# Altium PCB 0.PCB1.PcbDoc (part 11 of 12)
Units mm, origin at the board's own origin, x right, y up, seen from the top; angles counter-clockwise.
Board outline 77 x 72 mm, 6 copper layers (Top Layer, Layer 1, Layer 3, Layer 4, Layer 2, Bottom Layer), stack 1.538 mm thick; 570 components, 490 nets, 3331 pads, 1909 vias.
Unrouted connection lines stored in the file: 2.
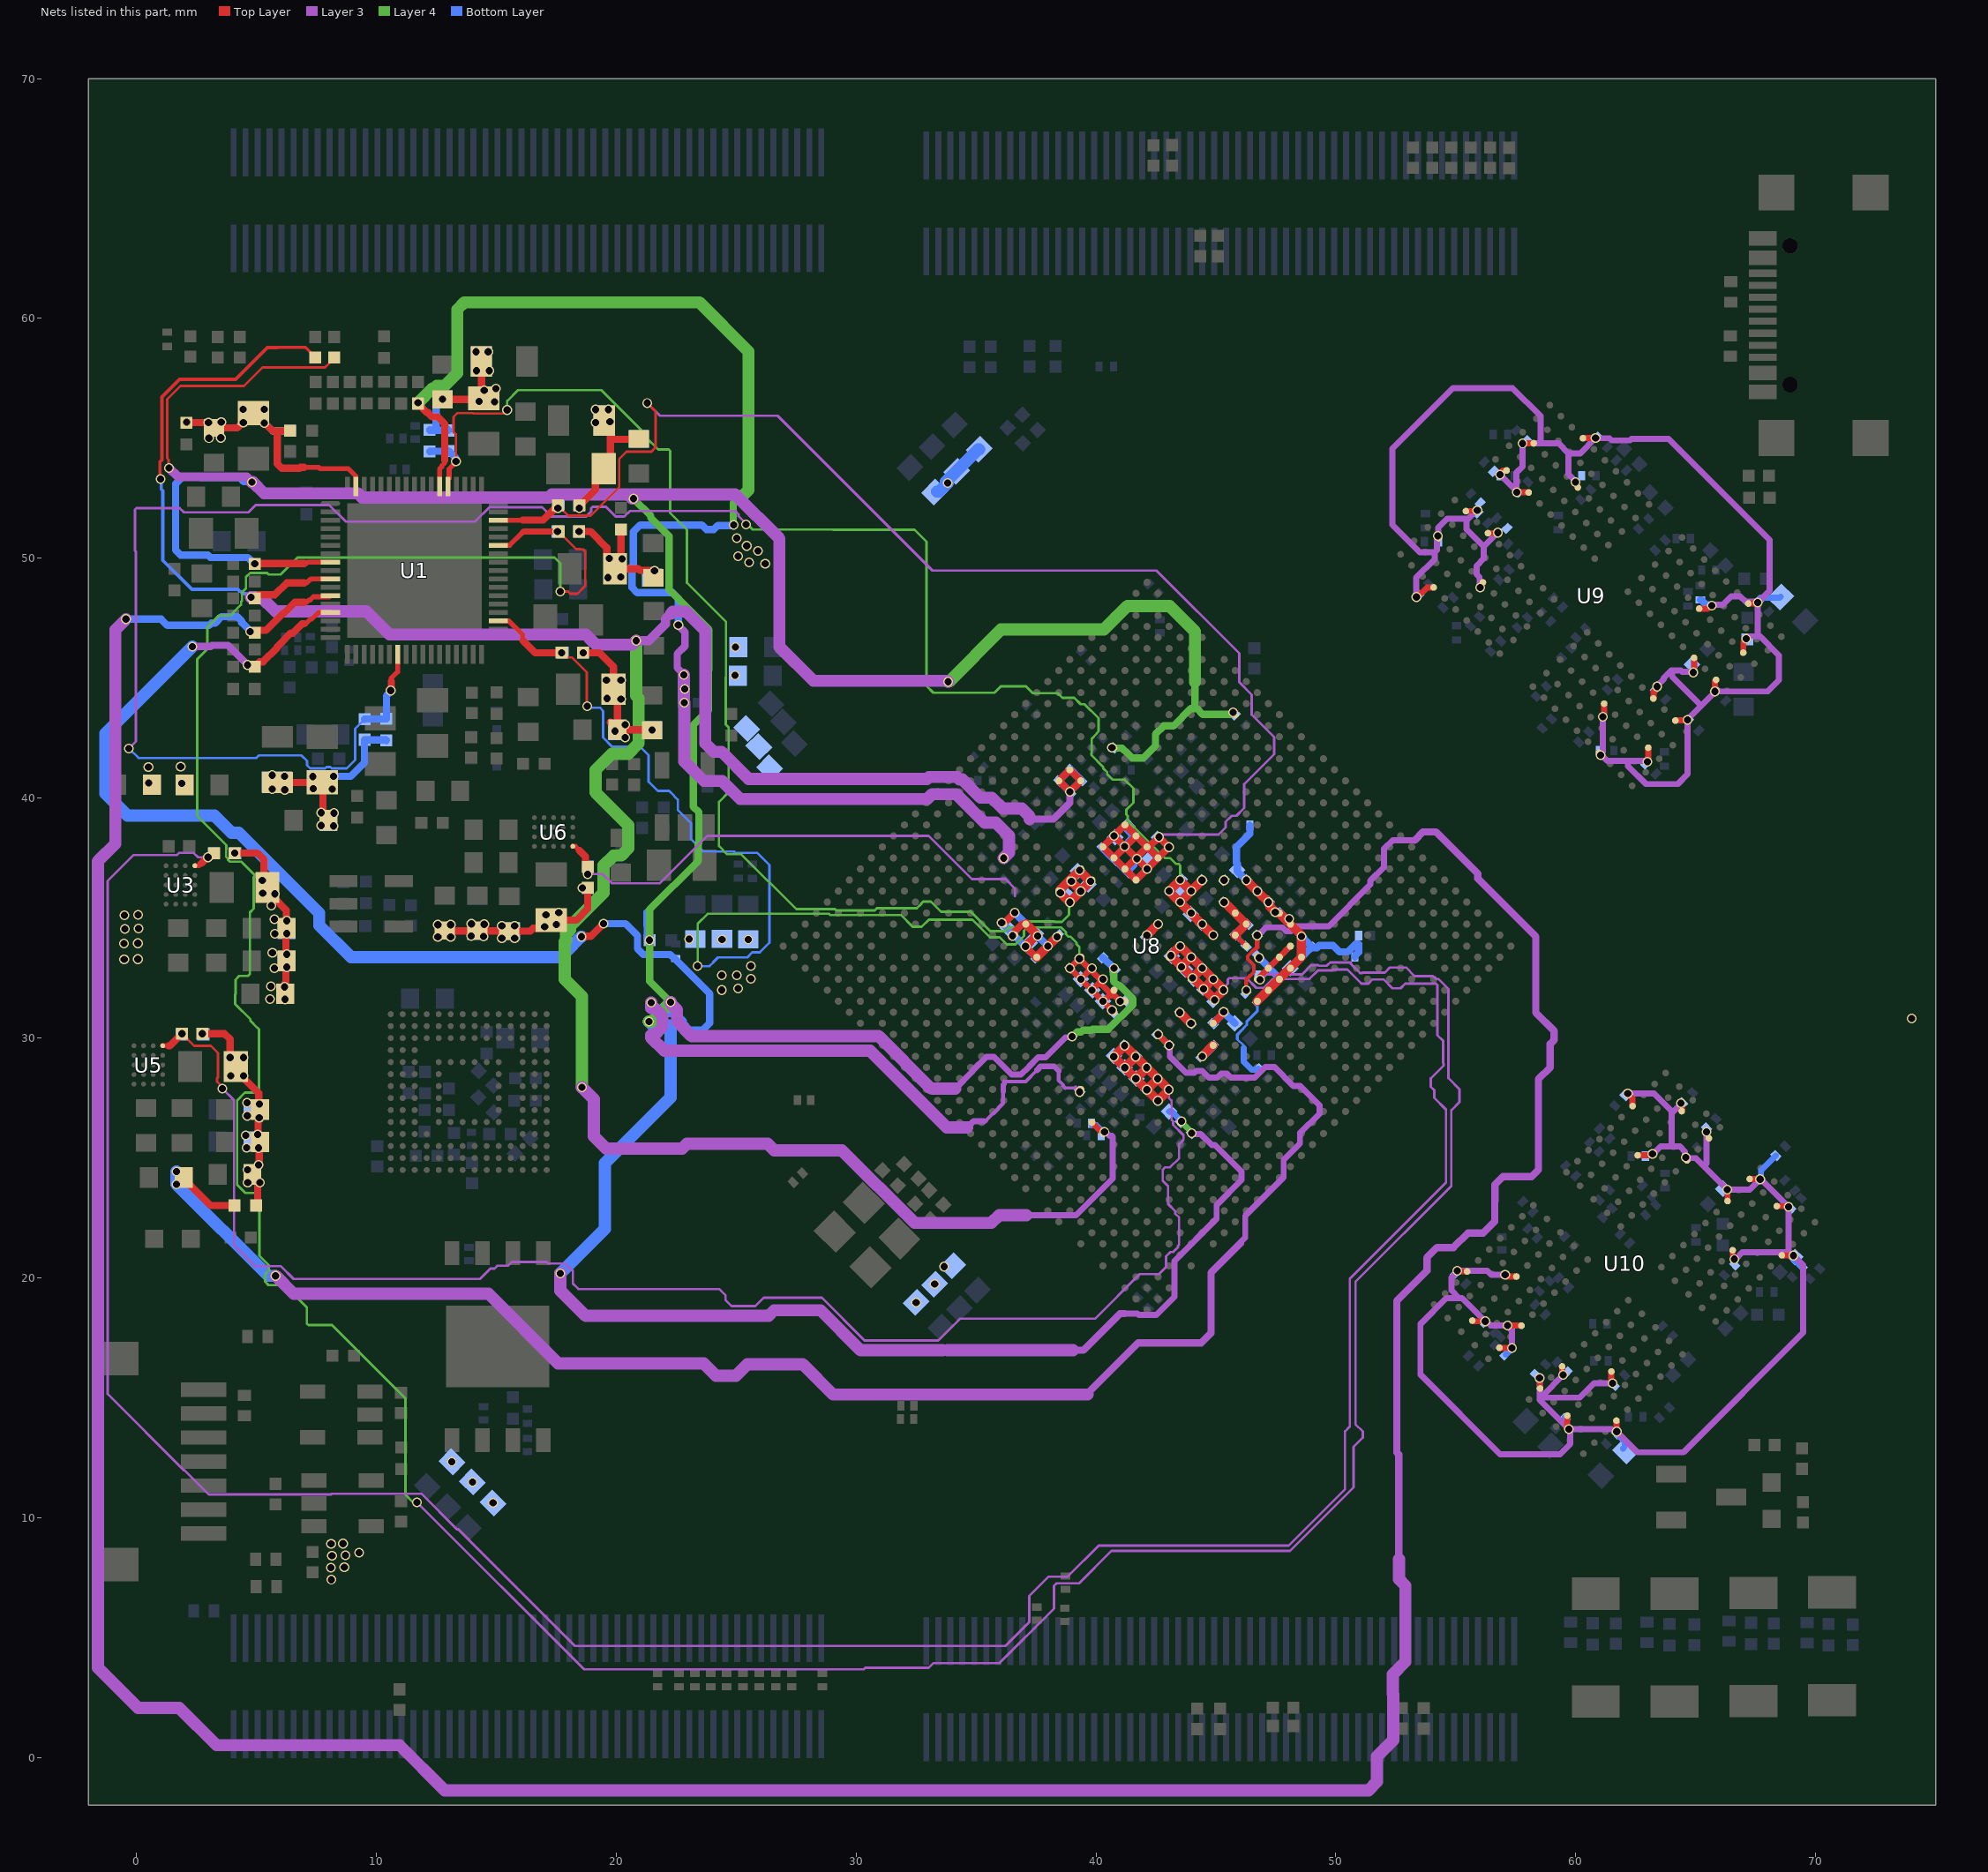
[diagram p15: the nets of this part, all layers, seen from the top]

## Via types
v1: diameter 0.41, hole 0.3, Top Layer to Bottom Layer, tented both sides, 1901 vias
v2: diameter 0.41, hole 0.3, Top Layer to Bottom Layer, 8 vias

## Nets (pads, with @x,y where several pads share a name; then routed paths per layer and width w, separated by ;. In a path a pad name is that pad's centre, name@x,y a point inside that pad or via, vN(x,y) a via of type N, cw(c..) or ccw(c..) an arc to the next point about the centre after c; other vN are vias at no path point) (continued)
VDD_0V75_S0: C36.2 C177.2 C178.2 C222.2 C239.2 C278.2 C279.2 C285.2 C286.2 R65.2 U1.8 U8.AD3 U8.AH10 U8.G24 U8.H24 U8.V20 | length 188.2
  Top Layer w0.102: v1(1.359,53.757) 1.34,53.776 1.34,54.107 1.282,54.165 1.282,56.627 1.836,57.181 4.487,57.181 5.26,57.954 7.859,57.954 8.05,58.145 8.05,58.175 8.181,58.306 R65.2@8.211,58.306
  Top Layer w0.203: 6.993,49.782 7.093,49.782 7.149,49.839 U1.8@8.09,49.839
  Top Layer w0.305: v1(4.936,49.768) 5.019,49.768 5.033,49.782 6.993,49.782
  Layer 3 w0.254: 33.181,27.908 33.199,27.89 ; 34.142,27.89 34.868,28.615 34.868,28.648 35.431,29.212 35.744,29.212 36.49,28.466 36.876,28.466 37.2,28.791 37.2,28.795 37.595,29.189 37.908,29.189 38.747,30.028 v1@38.917,30.028 ; 41.201,18.507 41.731,18.507 41.79,18.448 42.513,18.448 43.271,19.206 43.271,20.696 45.03,22.455 45.03,23.034 46.066,24.07 46.066,24.421 44.965,25.523 44.84,25.523 44.368,25.995 44.025,25.995 v1(43.995,26.025)
  Layer 3 w0.305: 33.109,27.908 33.181,27.908 ; 33.606,16.979 33.814,16.979 ; 39.054,16.979 39.48,16.979 41.007,18.507 41.201,18.507
  Layer 3 w0.381: v1(1.359,53.757) 1.367,53.757 1.727,53.396 4.594,53.396 4.812,53.178 v1(4.82,53.178)
  Layer 3 w0.508: v1(4.82,53.178) 4.848,53.178 5.321,52.705 9.242,52.705 9.413,52.535 17.197,52.535 17.32,52.658 20.491,52.658 20.666,52.483 v1(20.727,52.483) ; v1(17.672,20.181) 17.672,19.465 18.727,18.41 26.349,18.41 26.583,18.644 28.521,18.644 30.185,16.979 33.606,16.979 ; v1@20.647,52.66 24.959,52.66 26.806,50.812 26.806,46.302 28.219,44.89 33.797,44.89 v1(33.837,44.849) ; v1(22.275,31.484) 22.275,31.429 22.539,31.166 22.539,30.674 23.141,30.071 30.945,30.071 33.109,27.908 ; 33.199,27.89 34.142,27.89 ; 33.814,16.979 33.845,16.979 33.851,16.973 34.436,16.973 34.443,16.979 39.054,16.979
  Layer 4 w0.254: v1(43.565,26.522) 43.565,26.488 43.995,26.058 v1(43.995,26.025)
  Layer 4 w0.305: v1(20.727,52.483) 21.439,51.771 21.439,51.687 22.207,50.92 22.207,48.69 23.869,47.027 23.869,45.352 23.839,45.322 23.839,43.659 23.215,43.035 23.215,39.646 23.448,39.413 23.448,38.125 23.421,38.098 23.421,37.384 21.392,35.355 v1(21.392,34.075) 21.392,32.367 v1(22.275,31.484) ; v1@38.981,30.106 v1@38.996,30.092 ; v1(39.002,30.057) 39.03,30.057 39.222,30.249 39.387,30.249 39.456,30.318 39.821,30.318 39.865,30.361 40.52,30.361 41.538,31.379 41.538,31.631 40.987,32.182 40.919,32.182 40.74,32.361 40.74,32.628 40.728,32.64 v1@40.728,32.85 ; v1(40.673,42.1) 40.689,42.084 41.092,42.084 41.339,41.837 41.505,41.671 41.984,41.671 42.486,42.172 42.486,42.667 42.828,43.009 43.229,43.009 43.954,43.734 44.207,43.734 44.452,43.489 45.6,43.489 45.687,43.576 v1(45.715,43.576) ; 44.132,43.848 44.132,44.831
  Layer 4 w0.508: v1(21.368,30.681) 21.472,30.681 v1(22.275,31.484) ; v1(33.837,44.849) 33.869,44.849 36.045,47.026 40.334,47.026 41.312,48.004 43.068,48.004 44.132,46.94 44.132,44.831
  Bottom Layer w0.254: C286.2@43.05,26.931 43.156,26.931 v1(43.565,26.522)
  Bottom Layer w0.305: v1(4.82,53.178) 4.8,53.198 4.474,53.198 4.316,53.355 2.67,53.355 2.629,53.396 1.925,53.396 1.633,53.104 1.633,50.339 1.838,50.133 2.977,50.133 3.082,50.029 4.646,50.029 4.907,49.768 v1(4.936,49.768) ; 21.284,35.238 21.284,34.687 21.294,34.677 21.294,34.173 v1(21.392,34.075) ; C177.2@40.288,33.339 40.298,33.349 40.301,33.349 v1(40.749,32.901)
  Bottom Layer w0.508: v1(17.672,20.181) 19.527,22.036 19.527,24.773 22.268,27.515 22.268,30.517 21.533,30.517 v1(21.368,30.681)
VDD_0V75_S3: C21.2 C181.2 C182.2 U1.14 U8.P27 | length 73.3
  Top Layer w0.203: 6.993,47.27 7.065,47.27 7.261,47.466 7.313,47.466 7.586,47.739 U1.14@8.09,47.739
  Top Layer w0.305: v1(4.636,45.551) 4.664,45.524 4.984,45.524 5.143,45.683 5.284,45.683 5.862,46.261 5.862,46.301 6.44,46.879 6.524,46.879 6.914,47.27 6.993,47.27 ; v1(18.561,34.221) 18.581,34.241 18.954,34.241 v1(19.473,34.76)
  Layer 3 w0.142: 35.422,26.556 35.716,26.849 ; 36.174,28.177 37.071,28.177 37.546,28.652 ; 38.452,28.222 38.635,28.04 38.635,27.995 ; 38.718,27.912 39.152,27.912
  Layer 3 w0.158: 38.635,27.995 38.718,27.912
  Layer 3 w0.163: 38.452,28.222 38.452,28.613
  Layer 3 w0.17: 36.174,28.075 36.174,28.177
  Layer 3 w0.173: 35.331,26.523 35.389,26.523 35.422,26.556 ; 35.716,26.849 36.133,27.267 36.133,27.76
  Layer 3 w0.198: 39.152,27.912 v1(39.32,27.744)
  Layer 3 w0.211: 38.252,28.814 38.452,28.613
  Layer 3 w0.213: 36.133,27.76 36.138,27.765 36.138,28.039 36.174,28.075
  Layer 3 w0.254: 34.64,26.266 34.896,26.523 35.331,26.523 ; 37.546,28.652 37.708,28.814 38.252,28.814
  Layer 3 w0.305: v1(2.33,46.315) 2.336,46.321 3.097,46.321 3.145,46.369 3.824,46.369 4.636,45.557 v1(4.636,45.551)
  Layer 3 w0.508: v1(21.46,31.471) 21.45,31.461 21.45,31.242 21.601,31.242 21.929,30.913 21.929,30.449 21.601,30.12 21.45,30.12 21.45,30.021 22.008,29.462 30.586,29.462 33.781,26.266 34.64,26.266
  Bottom Layer w0.305: v1(19.473,34.76) 20.387,34.76 20.888,34.26 20.888,33.72 21.13,33.478 22.255,33.478 22.427,33.306 23.901,31.832 23.901,30.618 23.602,30.319 23.085,30.319 22.804,30.6 22.804,30.7 22.479,31.025 21.935,31.025 21.488,31.471 v1(21.46,31.471) ; v1(39.32,27.744) 39.375,27.744 C181.2@39.375,27.799
  Bottom Layer w0.508: v1(2.33,46.315) -1.29,42.695 -1.29,40.187 -0.378,39.274 3.248,39.274 3.969,38.552 4.273,38.552 7.622,35.203 7.622,34.694 8.953,33.363 17.683,33.363 17.922,33.603 18.54,34.221 v1(18.561,34.221)
VDD_CPU_BIG0_S0: C71.1 C71.2 C72.2 C73.2 C74.2 C75.2 C76.2 C113.2 C114.2 C115.2 C116.2 C117.2 C118.2 C119.2 C120.2 C121.2 C123.2 C124.2 L11.2 R20.1 R20.2 U3.A4 U8.M16 U8.M17 U8.M19 U8.N16 U8.N17 U8.N19 U8.P16 U8.P17 U8.R16 U8.R17 U8.T16 U8.T17 | length 136.3
  Top Layer w0.203: U3.A4@2.437,37.176 2.602,37.176 2.711,37.284
  Top Layer w0.305: 2.711,37.284 2.956,37.529 v1(2.984,37.529) 3.004,37.549 3.09,37.549 R20.2@3.244,37.703 ; v1(4.094,37.703) 5.047,37.703 5.327,37.424 5.327,36.636 v1(5.251,36.56) ; v1(5.625,35.517) L11.2@5.625,35.969 ; v1(5.778,36.005) 5.778,35.972 5.69,35.884 6.252,35.323 6.252,34.887 C75.2@6.255,34.884 ; v1(6.171,32.126) 6.171,31.868 C73.2@6.204,31.836 C73.2@6.204,32.175 ; C73.2@6.192,32.175 6.192,32.287 6.23,32.325 C74.2@6.23,32.953 ; v1(6.272,32.953) C74.2@6.23,32.953 ; v1(6.272,33.487) C74.2@6.23,33.487 ; v1(6.272,34.884) C75.2@6.255,34.884 ; v1(6.275,34.35) C75.2@6.23,34.35 ; C74.2@6.23,32.953 C74.2@6.23,33.487 ; C74.2@6.23,33.487 C75.2@6.23,34.35 ; C75.2@6.23,34.35 6.23,34.553 C75.2@6.255,34.579 C75.2@6.255,34.884
  Top Layer w0.381: v1(43.5,31.055) 43.954,30.602 v1(43.966,30.602) ; v1(43.571,32.963) 43.571,32.967 U8.R17@43.578,32.974 ; v1(44.03,32.504) U8.P17@44.04,32.513 ; v1(44.431,32.908) v1(43.972,33.368) ; v1(44.49,32.044) 44.49,32.048 U8.N17@44.498,32.055 ; v1(44.891,32.448) v1(44.431,32.908) 44.223,32.7 44.223,32.696 U8.P17@44.04,32.513 ; v1(44.946,31.581) U8.M17@44.946,31.606 ; U8.R17@43.578,32.974 U8.P17@44.04,32.513 ; U8.R17@43.578,32.974 v1(43.972,33.368) ; U8.R17@43.578,32.974 v1(43.12,33.432) 43.12,33.435 v1(43.512,33.827) v1(43.972,33.368) ; U8.P17@44.04,32.513 U8.N17@44.497,32.055 ; U8.N17@44.498,32.055 U8.M17@44.946,31.606 ; U8.N17@44.498,32.055 v1(44.891,32.448) 45.321,32.019 v1(45.321,31.993) 44.946,31.618 U8.M17@44.946,31.606
  Layer 3 w0.102: v1(2.984,37.529) 2.571,37.529 2.387,37.713 1.779,37.713 1.692,37.625 -0.12,37.625 -1.197,36.548 -1.197,15.151 1.975,11.979 1.998,11.979 3.012,10.966 8.122,10.966 8.15,10.993 11.541,10.993 11.543,10.995 11.839,10.995 11.841,10.993 11.875,10.993 13.359,9.509 13.416,9.509 18.279,4.646 36.232,4.646 37.226,5.64 37.226,6.735 38.028,7.537 38.821,7.537 40.118,8.834 48.032,8.834 50.385,11.187 50.385,13.599 50.584,13.798 50.584,19.959 54.595,23.97 54.595,27.013 54.103,27.504 54.103,27.821 53.962,27.963 53.962,28.314 54.49,28.842 54.49,28.937 54.475,28.953 54.475,29.881 54.238,30.117 54.238,32.206 54.179,32.266 52.895,32.266 52.699,32.07 52.354,32.07 51.985,32.439 51.538,32.439 51.363,32.263 51.066,32.263 50.482,32.847 49.886,32.847 49.855,32.817 49.259,32.817 48.902,32.459 47.383,32.459 47.01,32.086 46.687,32.086 46.278,32.495 45.563,32.495 45.503,32.435 45.503,32.259 v1@45.317,32.073
  other v1: 14.865,10.612 14.008,11.48 13.15,12.324 5.567,31.618 6.191,31.609 5.605,32.149 5.757,32.901 -0.511,33.273 0.063,33.285 5.669,33.549 -0.514,33.932 0.06,33.944 5.775,34.339 -0.486,34.544 0.088,34.556 5.755,34.953 -0.504,35.116 0.07,35.128 5.269,36.027
VDD_CPU_BIG1_MEM_S0: C88.2 C144.2 C145.2 FB1.2 U8.M21 U8.N21 | length 71.9
  Top Layer w0.254: v1(42.59,30.144) 42.595,30.144 43.049,29.689 v1(43.049,29.684)
  Top Layer w0.305: C88.2@2.192,23.912 3.094,23.01 FB1.2@4.091,23.01
  Layer 3 w0.254: v1(43.049,29.684) 43.079,29.654 43.079,29.224 43.438,28.865 43.438,28.862 43.758,28.542 44.106,28.542 44.181,28.618 44.434,28.618 44.71,28.341 45.061,28.341 45.239,28.519 45.45,28.519 45.629,28.34 46.616,28.34 47.059,28.782 47.443,28.782 48.229,27.996 48.51,27.996 49.32,27.186 49.32,26.835 48.506,26.02 48.506,25.593 47.825,24.913 47.825,24.179 46.225,22.578 46.225,21.667 46.022,21.463 46.022,21.428
  Layer 3 w0.305: 39.654,15.126 39.654,15.172 41.765,17.283 44.398,17.283 44.802,17.686 44.802,20.209 46.022,21.428
  Layer 3 w0.508: v1(5.802,20.079) 6.553,19.327 14.683,19.327 17.584,16.427 23.644,16.427 24.162,15.908 24.988,15.908 25.473,16.394 27.78,16.394 29.048,15.126 39.654,15.126
  Layer 4 w0.254: v1(42.59,30.144) v1(43.049,29.684)
  Bottom Layer w0.508: v1(1.671,24.433) v1(1.671,23.899) 5.491,20.079 v1(5.802,20.079)
VDD_CPU_BIG1_S0: C82.1 C82.2 C83.2 C84.2 C85.2 C86.2 C87.2 C134.2 C135.2 C136.2 C137.2 C138.2 C139.2 C140.2 C141.2 C142.2 C143.2 FB1.1 L12.2 R24.1 R24.2 U5.A4 U8.K23 U8.K24 U8.L23 U8.L24 U8.M23 U8.M24 U8.N23 U8.N24 U8.P23 U8.P24 | length 80
  Top Layer w0.102: v1(1.899,30.173) 2.405,29.668 3.108,29.668 3.4,29.375 3.4,28.354 3.367,28.321 3.367,28.171 3.586,27.953 v1(3.586,27.884)
  Top Layer w0.203: U5.A4@1.099,29.671 1.34,29.671
  Top Layer w0.305: 1.34,29.671 1.398,29.671 v1(1.899,30.173) ; v1(2.749,30.173) 3.677,30.173 3.906,29.944 v1(3.906,29.182) ; v1(4.465,28.42) 4.492,28.393 4.492,28.304 5.098,27.698 5.098,27.269 v1(5.122,27.244) ; v1(4.614,27.297) 4.634,27.277 5.09,27.277 v1(5.122,27.244) ; FB1.1@4.991,23.01 5.052,23.071 C87.2@5.052,23.973 ; v1(5.054,25.969) C84.2@5.069,25.954 ; v1@5.09,24.731 5.115,24.756 5.115,25.391 5.092,25.413 v1(5.089,25.413) 5.089,25.62 C84.2@5.143,25.673 ; v1(5.095,24.707) 5.074,24.687 5.074,24.596 C87.2@4.834,24.356 ; v1(5.144,23.973) 5.117,23.973 4.834,24.256 C87.2@4.834,24.306 ; C84.2@5.153,25.663 5.153,25.871 C84.2@5.069,25.954 ; C87.2@4.834,24.306 C87.2@4.834,24.356 ; C87.2@4.834,24.306 C87.2@4.834,24.356 ; C84.2@5.069,25.954 5.074,25.959 5.074,26.52 5.097,26.543 5.097,26.65 5.135,26.688 5.135,27.232 v1(5.122,27.244)
  Top Layer w0.381: v1(42.12,28.759) v1(41.661,29.218) ; v1(42.58,28.299) v1(42.12,28.759) 41.663,28.301 v1(41.663,28.3) ; v1(43.04,27.839) 42.582,27.382 v1(42.582,27.38) v1(42.122,27.84) ; v1(43.04,27.839) v1(42.58,28.299) 42.122,27.841 v1(42.122,27.84) ; v1(41.203,28.759) v1(40.744,29.219) 40.744,29.22 v1(41.201,29.678) v1(41.661,29.218) ; v1(41.203,28.759) v1(41.663,28.3) ; v1(41.203,28.759) 41.203,28.761 v1(41.661,29.218) ; v1(41.663,28.3) v1(42.122,27.84)
  Layer 3 w0.102: v1(3.586,27.884) 4.073,27.397 4.073,21.362 4.95,20.485 6.014,20.485 6.552,19.947 14.327,19.947 14.758,20.378 14.926,20.378 15.045,20.497 15.487,20.497 15.651,20.661 17.101,20.661 17.174,20.588 17.878,20.588 18.12,20.346 18.136,20.346 18.196,20.286 18.196,19.754 18.421,19.529 24.298,19.529 24.556,19.271 24.556,19.075 24.814,18.817 25.798,18.817 26.149,19.167 28.572,19.167 30.354,17.385 33.43,17.385 34.336,18.291 39.966,18.291 41.824,20.149 42.632,20.149 42.928,20.445 42.928,20.889 43.108,21.07 43.218,21.07 43.421,21.273 43.421,21.334 43.469,21.382 43.469,22.507 43.311,22.665 43.311,22.769 43.007,23.074 43.007,23.82 42.786,24.041 42.786,24.499 42.892,24.605 43.09,24.605 43.47,24.985 43.47,25.574 43.652,25.756 43.652,25.944 43.218,26.378 43.218,26.523 43.151,26.589 43.151,27.393 43.04,27.505 43.04,27.773 v1@43.088,27.821
  other v1: 32.505,18.97 33.28,19.733 33.672,20.463 4.642,23.973 4.637,24.504 4.59,25.424 4.555,25.932 5.117,26.67 4.625,26.756 3.931,28.42 4.465,29.182
VDD_CPU_LIT_S0: C26.1 C26.2 C27.2 C28.2 C29.2 C30.2 C154.2 C155.2 C156.2 C157.2 C158.2 C159.2 C160.2 C168.2 C169.2 L4.2 R4.1 R4.2 U1.37 U8.T21 U8.T22 U8.U21 U8.U22 U8.V21 U8.V22 U8.W21 U8.W22 U8.Y21 U8.Y22 | length 58.4
  Top Layer w0.102: v1(17.726,46.06) 17.925,45.86 18.162,45.86 18.775,45.248 18.775,43.844 v1(18.792,43.827)
  Top Layer w0.203: U1.37@15.091,47.389 15.528,47.389 16.101,46.816 16.101,46.585 16.112,46.574
  Top Layer w0.254: v1(39.374,32.446) 39.374,32.449 U8.W21@39.769,32.843 ; v1(39.832,32.902) 39.827,32.902 U8.W21@39.769,32.843 ; v1(39.834,31.987) 39.834,31.989 U8.V21@40.188,32.343 ; v1(40.292,32.442) 40.287,32.442 U8.V21@40.188,32.343 ; v1(40.294,31.527) 40.304,31.527 40.601,31.824 40.651,31.824 40.679,31.852 v1(41.007,31.524) ; 40.645,31.771 40.645,31.825 40.19,32.28 40.19,32.34 U8.V21@40.188,32.343 ; v1(40.672,31.148) v1(38.915,32.906) 39.309,33.3 v1(39.312,33.3) U8.W21@39.769,32.843 ; U8.W21@39.769,32.843 40.155,32.457 40.155,32.376 U8.V21@40.188,32.343
  Top Layer w0.305: 16.112,46.574 16.626,46.06 v1(17.726,46.06) ; v1(18.626,46.06) 19.308,46.06 19.891,45.476 L4.2@19.891,44.536 20.049,44.378 20.049,43.132 C27.2@19.954,43.037 ; C27.2@19.747,43.158 19.767,43.138 19.82,43.138 19.871,43.087 19.871,43.037 20.061,42.847 21.484,42.847 v1(21.496,42.834)
  Layer 4 w0.102: v1(23.398,32.992) 23.398,34.753 23.819,35.174 27.22,35.174 28.868,35.174 28.918,35.124 31.866,35.124 32.359,34.631 32.737,34.631 33.037,34.93 34.843,34.93 35.58,34.194 35.994,34.194 36.286,33.902 36.654,33.902 37.002,34.25 37.002,34.463 37.147,34.608 38.546,34.608 38.744,34.41 38.744,34.328 38.856,34.217 38.945,34.217 39.194,33.968 39.194,33.909 39.312,33.791 v1(39.312,33.3)
  Bottom Layer w0.102: v1(18.792,43.827) 18.85,43.769 19.322,43.769 19.458,43.632 19.458,42.52 19.834,42.144 20.994,42.144 21.353,41.785 21.353,40.678 21.737,40.295 22.209,40.295 22.267,40.237 22.57,39.934 22.57,39.503 23.118,38.954 23.118,38.288 23.637,37.77 24.909,37.77 24.967,37.712 25.887,37.712 26.39,37.209 26.39,33.967 25.991,33.569 25.678,33.569 25.465,33.356 24.249,33.356 24.045,33.152 ; v1(23.398,32.992) 23.896,32.992 24.051,33.147
  other v1: 24.401,31.997 25.082,32.065 25.62,32.464 24.399,32.611 25.034,32.614 25.618,33.003 20.376,42.524 19.954,42.792 20.374,43.062 20.201,44.129 19.617,44.155 19.591,44.917 20.201,44.917
VDD_DDR_S0: C6.2 C7.2 C8.2 C9.1 C9.2 C201.2 C202.2 C203.2 C206.2 C207.2 C208.2 C209.2 C210.2 C213.2 C214.2 L1.2 R1.1 R1.2 U1.46 U8.L11 U8.L12 U8.L13 U8.L14 U8.L17 U8.L18 U8.N13 U8.P12 U8.P13 U8.R12 U8.T12 U8.U11 | length 161.6
  Top Layer w0.102: R1.2@17.602,51.114 18.34,50.376 18.518,50.376 18.527,50.367 18.62,50.367 18.71,50.278 18.71,48.852 18.382,48.525 18.081,48.525 17.997,48.608 v1(17.673,48.608)
  Top Layer w0.203: U1.46@15.091,50.539 15.564,50.539 16.112,51.086 ; U8.P13@45.807,34.285 U8.N13@46.267,33.825
  Top Layer w0.254: 16.112,51.086 16.139,51.114 R1.2@17.602,51.114 ; v1(46.838,32.433) 46.827,32.445 46.724,32.445 U8.L14@46.726,32.447 U8.L12@47.646,33.366 48.096,33.816 U8.L11@48.099,33.816
  Top Layer w0.305: v1(18.452,51.114) 18.935,51.114 19.61,50.44 19.61,50.062 L1.2@19.697,49.975 ; v1(19.718,49.997) 19.957,49.758 L1.2@19.957,49.565 20.914,49.565 20.981,49.499 21.58,49.499 v1(21.6,49.478) ; C8.2@20.201,51.198 20.201,50.022 v1(20.252,49.971) ; C7.2@21.547,49.182 21.562,49.196 21.562,49.482 C7.2@21.577,49.497 ; U8.L18@44.888,30.608 45.327,31.047 v1(45.327,31.091)
  Top Layer w0.381: v1(45.344,35.655) 45.357,35.655 U8.P12@46.267,34.745 U8.P13@45.807,34.285
  Layer 3 w0.102: v1(11.691,10.638) 18.656,3.673 30.332,3.673 30.39,3.732 33.029,3.732 33.23,3.932 35.981,3.932 38.252,6.203 38.252,7.153 38.353,7.255 39.291,7.255 40.642,8.606 48.092,8.606 50.743,11.258 50.743,12.952 50.886,13.095 50.891,13.095 51.127,13.33 51.127,13.587 50.82,13.894 50.82,19.83 54.818,23.828 54.818,26.985 55.155,27.323 55.155,27.857 54.693,28.319 54.693,32.035 54.269,32.459 54.177,32.459 54.119,32.517 54.11,32.517 54.052,32.576 53.286,32.576 52.925,32.937 52.257,32.937 52.041,32.721 51.117,32.721 51.095,32.699 51.011,32.699 50.629,33.081 50.629,33.142 49.761,33.142 49.629,33.01 49.294,33.01 49.273,33.031 48.976,33.031 48.597,32.652 47.125,32.652 46.914,32.441 v1@46.819,32.441
  Layer 4 w0.102: 4.896,49.388 4.739,49.388 4.566,49.215 4.566,48.743 4.404,48.58 4.404,48.227 4.363,48.187 4.363,48.062 3.912,47.611 3.436,47.611 2.959,47.133 2.959,46.211 2.537,45.789 2.537,39.254 3.751,38.039 3.751,37.865 3.737,37.851 3.737,37.555 3.825,37.467 3.825,37.415 3.893,37.346 4.381,37.346 4.914,36.813 4.914,36.729 4.893,36.708 4.893,35.392 4.734,35.233 4.734,32.665 4.653,32.583 4.289,32.583 4.132,32.426 4.132,31.819 4.122,31.809 4.122,31.407 4.754,30.775 4.754,30.706 5.036,30.424 5.053,30.424 5.112,30.365 5.112,27.869 5.124,27.858 5.124,27.794 5.044,27.714 4.526,27.714 4.198,27.386 4.198,23.879 4.543,23.533 5.071,23.533 5.13,23.474 5.13,20.912 5.521,20.521 5.521,20.3 5.369,20.148 5.369,19.828 5.506,19.69 6.07,19.69 6.104,19.725 6.137,19.725 7.109,18.753 7.109,18.082 7.168,18.022 8.155,18.022 11.213,14.963 11.213,10.955 11.531,10.638 v1(11.691,10.638) ; 4.897,49.389 5.452,49.389 5.521,49.32 6.009,49.32 6.72,50.031 17.436,50.031 17.673,49.794 v1(17.673,48.608)
  Bottom Layer w0.203: v1(45.344,35.655) 45.379,35.62 45.457,35.62 C203.2@46.34,34.736 45.879,34.275 C214.2@45.811,34.275 ; C214.2@45.805,34.281 C214.2@45.811,34.275 ; C213.2@46.265,33.821 C214.2@45.811,34.275
  Bottom Layer w0.254: C9.1@18.431,51.114 C9.1@18.437,51.12
  Bottom Layer w0.305: C207.2@44.883,30.597 45.27,30.984 C206.2@45.27,31.092 ; v1(45.327,31.091) 45.327,31.07 C206.2@45.34,31.056 C201.2@45.722,30.674 ; C201.2@45.722,30.673 C201.2@45.79,30.605
  other v1: 8.131,7.408 8.109,7.907 8.671,7.926 8.153,8.405 8.717,8.424 9.28,8.537 8.116,8.904 8.616,8.914 45.342,36.574 19.654,49.19 20.185,49.225 17.552,51.114
VDD_GPU_S0: C10.1 C10.2 C11.2 C12.2 C13.2 C14.2 C104.2 C105.2 C106.2 C107.2 C108.2 C109.2 C110.2 C111.2 C112.2 C122.2 L2.2 R2.1 R2.2 U1.49 U8.AA12 U8.AA13 U8.AA14 U8.AA15 U8.AB12 U8.AB13 U8.AB14 U8.AB15 U8.AC13 U8.AC14 U8.AC15 U8.AD13 U8.AD14 U8.AD15 | length 77.3
  Top Layer w0.102: v1(17.57,52.092) 17.691,52.092 18.005,51.778 18.943,51.778 20.124,52.959 20.124,54.133 20.434,54.443 21.47,54.443 21.648,54.621 21.648,56.124 v1(21.3,56.472)
  Top Layer w0.203: U1.49@15.091,51.589 16.112,51.589
  Top Layer w0.305: 16.112,51.589 16.959,51.589 C10.2@17.534,52.164 ; v1(17.57,52.092) 17.57,52.128 C10.2@17.534,52.164 ; C10.2@17.57,52.199 C10.2@17.534,52.164 ; v1(18.459,52.093) 18.477,52.111 C10.1@18.477,52.206 19.137,52.867 19.137,53.383 19.762,54.008 19.762,54.972 ; C11.2@19.5,55.737 19.593,55.644 19.7,55.644 v1(19.743,55.687) ; C11.2@19.608,55.629 19.762,55.475 19.762,54.972 ; v1(19.677,56.198) 19.5,56.021 19.5,55.93 C11.2@19.689,55.741 ; C13.2@20.909,54.981 20.888,54.96 19.775,54.96 19.762,54.972 ; v1(40.751,38.418) U8.AC14@41.209,37.96 ; v1(41.192,37.981) U8.AC14@41.211,37.962 ; U8.AD13@41.209,38.877 41.207,38.877 U8.AD14@40.752,38.422 U8.AD15@40.292,37.962 U8.AC15@40.752,37.502 ; U8.AD13@41.211,38.881 U8.AC13@41.671,38.422 U8.AB13@42.13,37.962 ; U8.AC13@41.668,38.418 U8.AC14@41.211,37.962 ; v1(41.711,37.462) U8.AB14@41.67,37.502 ; U8.AC15@40.752,37.502 U8.AC14@41.209,37.96 ; U8.AC15@40.752,37.502 U8.AB15@41.211,37.043 ; U8.AC14@41.209,37.96 U8.AC14@41.211,37.962 ; U8.AB15@41.211,37.043 U8.AB14@41.668,37.5 ; U8.AB15@41.211,37.043 U8.AA15@41.671,36.583 U8.AA14@42.128,37.04 ; U8.AC14@41.211,37.962 U8.AB14@41.67,37.502 ; U8.AB14@41.668,37.5 U8.AB14@41.67,37.502 ; U8.AB14@41.668,37.5 41.709,37.46 U8.AA14@42.128,37.04 ; U8.AB14@41.671,37.502 U8.AB13@42.13,37.962 ; U8.AA14@42.128,37.04 v1(42.129,37.039) 42.587,37.498 U8.AA13@42.586,37.499 ; U8.AA14@42.128,37.04 U8.AA14@42.13,37.043 U8.AA13@42.586,37.499 ; U8.AB13@42.13,37.962 42.13,37.955 U8.AA13@42.586,37.499 ; U8.AB13@42.13,37.962 42.211,37.962 v1(42.624,38.375) v1(43.046,37.953) 43.041,37.953 U8.AA13@42.586,37.499
  Layer 3 w0.102: v1(21.3,56.472) 21.831,55.941 26.73,55.941 33.184,49.487 41.533,49.487 42.524,49.487 45.973,46.038 45.973,44.831 46.491,44.313 46.491,43.475 47.429,42.538 47.429,41.832 46.179,40.582 46.179,39.581 45.859,39.261 45.664,39.261 45.409,39.007 45.409,38.771 45.12,38.481 45.12,38.476 42.809,38.476 42.707,38.375 v1(42.624,38.375)
  Bottom Layer w0.305: C110.2@40.26,37.928 40.779,37.409 40.808,37.409 C111.2@41.297,36.92 ; v1(41.192,37.981) 41.192,38.007 41.496,38.311 41.496,38.501 41.308,38.689 C108.2@41.308,38.821 ; C111.2@41.329,36.888 C111.2@41.297,36.92 ; v1(41.711,37.462) 41.711,37.433 41.575,37.297 41.575,37.201 41.297,36.923 C111.2@41.297,36.92
  Bottom Layer w0.508: C106.2@33.367,52.779 33.459,52.779 v1(33.82,53.14) ; v1@33.746,53.193 34.188,53.635 35.091,54.538 C105.2@35.129,54.538
  other v1: 19.144,55.652 19.148,56.2
VDD_LOGIC_S0: C43.1 C43.2 C44.2 C45.2 C46.2 C47.2 C125.2 C126.2 C127.2 C128.2 C129.2 C130.2 C131.2 C132.2 C133.2 L6.2 R8.1 R8.2 U1.56 U8.AC17 U8.AC18 U8.AC19 U8.AD17 U8.AD18 U8.AD19 U8.K19 U8.K20 U8.V16 U8.V17 | length 62.9
  Top Layer w0.102: v1@13.325,54.086 13.325,55.153 13.217,55.261 13.217,55.891 13.375,56.048 14.033,56.048 14.048,56.033 15.298,56.033 15.445,56.18 v1(15.454,56.18)
  Top Layer w0.203: U1.56@12.99,52.989 12.99,53.286 13.037,53.332 13.037,53.723 13.325,54.011 v1(13.325,54.033) v1@13.325,54.086
  Top Layer w0.305: v1(12.759,56.626) L6.2@14.27,56.626 ; v1(14.156,58.607) 14.156,58.429 C45.2@14.384,58.201 14.384,56.997 14.374,56.986 14.374,56.784 L6.2@14.486,56.672 ; v1(14.293,56.542) 14.356,56.542 L6.2@14.486,56.672 ; v1(14.498,56.998) 14.486,56.986 L6.2@14.486,56.672
  Top Layer w0.381: v1(38.981,36.526) 39.368,36.139 U8.AC18@39.368,36.115 ; v1(39.368,36.112) U8.AC18@39.368,36.115 ; v1(42.123,34.274) 42.123,34.277 v1(42.593,34.747) ; v1(44.426,29.224) 44.426,29.227 U8.K19@44.888,29.689 ; U8.AC18@39.368,36.115 v1(38.91,35.657) v1(38.519,36.048) 38.519,36.185 v1(39.318,36.983) v1(39.778,36.524) U8.AC18@39.368,36.115
  Layer 4 w0.102: v1(15.454,56.18) 15.458,56.184 15.458,56.556 15.912,57.01 19.385,57.01 21.266,55.129 21.266,55.015 21.751,54.53 22.19,54.53 22.25,54.47 22.25,51.882 22.951,51.181 22.951,48.974 24.581,47.344 24.581,45.057 24.569,45.045 24.569,43.069 24.688,42.949 24.688,40.243 24.287,39.842 24.287,37.997 24.626,37.657 25.218,37.657 27.508,35.367 29.121,35.367 29.171,35.317 30.784,35.317 30.87,35.403 32.539,35.403 32.717,35.581 32.717,35.601 32.801,35.685 33.126,35.685 33.548,35.263 34.785,35.263 35.594,34.454 36.218,34.454 36.37,34.606 36.672,34.606 36.926,34.859 38.264,34.859 38.285,34.839 38.582,34.839 38.882,35.138 38.882,35.629 v1(38.91,35.657)
  Bottom Layer w0.203: v1@13.304,54.086 13.304,54.053 v1(13.325,54.033)
  Bottom Layer w0.305: C43.2@12.225,54.449 12.238,54.461 13,54.461 R8.2@13.013,54.474 13.304,54.182 v1@13.304,54.086 ; C43.1@12.225,55.349 12.238,55.336 12.535,55.336 ; 12.539,55.332 12.535,55.336 ; v1(12.759,56.626) 12.719,56.626 12.496,56.403 12.496,55.375 12.535,55.336 ; R8.1@12.915,55.421 R8.1@13,55.336 ; R8.1@13.013,55.324 R8.1@13,55.336 ; 12.535,55.336 R8.1@13,55.336
  Bottom Layer w0.381: v1(44.426,29.224) C133.2@44.885,29.682
  other v1: 24.952,45.116 24.973,46.297 14.927,56.523 14.993,57.067 14.181,57.82 14.715,57.82 14.664,58.607
VDD_NPU_S0: C95.1 C95.2 C96.2 C97.2 C98.2 C99.2 C100.2 C161.2 C162.2 C163.2 C164.2 C165.2 C166.2 C167.2 C170.2 C171.2 L13.2 R27.1 R27.2 U6.A4 U8.AB21 U8.AB22 U8.AB23 U8.AC22 U8.AC23 U8.AD22 U8.AD23 U8.AE22 U8.AE23 | length 38.7
  Top Layer w0.102: v1(18.808,36.828) 18.808,37.111 R27.2@18.816,37.119
  Top Layer w0.203: U6.A4@18.193,37.984 18.299,37.984 18.469,37.814 ; U8.AD22@37.075,34.745 U8.AD22@37.078,34.745
  Top Layer w0.305: C97.2@12.847,34.477 12.859,34.465 15.526,34.465 C99.2@15.539,34.452 16.421,34.452 16.534,34.565 16.944,34.565 17.061,34.682 L13.2@17.292,34.913 18.348,34.913 18.816,35.38 R27.1@18.816,36.269 ; 18.469,37.814 18.718,37.564 18.718,37.217 R27.2@18.816,37.119 ; v1(36.074,34.801) 36.121,34.755 36.149,34.755 v1(36.621,35.228) ; v1@36.616,34.438 36.923,34.745 U8.AD22@37.078,34.745 ; U8.AC23@37.063,33.813 37.521,33.354 U8.AB23@37.524,33.354
  Top Layer w0.381: v1(37.065,33.814) U8.AC22@37.534,34.285 ; U8.AD22@37.089,34.759 U8.AC22@37.549,34.3 ; U8.AB23@37.524,33.354 v1(37.996,33.825) 38.383,34.213 v1(38.386,34.213) ; U8.AC22@37.534,34.285 v1(37.568,34.253)
  Layer 3 w0.102: v1(18.808,36.828) 19.448,36.828 19.827,36.449 21.823,36.449 23.794,38.42 33.027,38.42 34.828,36.62 36.24,36.62 36.621,36.239 36.621,35.918
  Bottom Layer w0.305: v1(24.414,34.097) C162.2@24.414,34.127 ; v1(36.074,34.801) v1(36.074,34.801) 37.063,33.814 v1(37.065,33.814) 37.065,33.791 37.511,33.345 37.511,33.341 C170.2@37.501,33.331 37.505,33.331 v1(38.386,34.213) ; v1(36.621,35.228) 36.621,35.214 37.568,34.267 v1(37.568,34.253) v1(37.996,33.825)
  other v1: 23.04,34.118 25.511,34.104 15.234,34.161 15.768,34.161 12.567,34.212 13.101,34.212 14.477,34.229 13.952,34.252 36.519,34.258 17.018,34.639 15.234,34.669 15.768,34.669 12.567,34.72 13.101,34.72 17.511,34.727 13.965,34.752 14.498,34.735 17.076,35.136 17.61,35.217 18.59,36.251
VDD_VDENC_S0: C55.1 C55.2 C56.2 C57.2 C58.2 C59.2 C146.2 C147.2 C148.2 C149.2 C150.2 C151.2 C152.2 C153.2 L8.2 R10.1 R10.2 U1.24 U8.R14 U8.T14 U8.U14 U8.V12 U8.V13 U8.V14 U8.W13 U8.W14 | length 97
  Top Layer w0.203: 10.628,44.866 10.628,45.001 10.889,45.263 10.889,45.987 U1.24@10.89,45.988
  Top Layer w0.305: C57.2@5.883,40.649 C57.2@6.01,40.649 ; C57.2@6.251,40.408 C57.2@6.01,40.649 ; v1(7.701,39.391) 7.71,39.391 7.753,39.347 7.786,39.347 C58.2@8.009,39.125 ; C58.2@8.009,39.075 C58.2@8.009,39.125 ; v1(10.6,44.485) 10.628,44.513 10.628,44.866 ; C57.2@6.01,40.649 7.75,40.649 L8.2@7.755,40.654 7.78,40.629 7.78,39.353 C58.2@8.009,39.125
  Top Layer w0.381: v1(44.424,36.574) 44.421,36.574 v1(43.967,36.119) ; v1(44.887,34.282) v1(44.427,34.741) v1(43.968,35.201) v1(43.508,35.661) ; v1(43.508,35.661) v1(43.048,36.12) v1(43.507,36.579) v1(43.967,36.119) ; v1(43.508,35.661) v1(43.967,36.119)
  Layer 3 w0.102: v1(-0.316,42.07) -0.026,42.36 -0.026,50.275 -0.054,50.303 -0.054,52.034 0.005,52.093 1.805,52.093 1.983,51.915 4.67,51.915 4.973,52.218 8.036,52.218 8.724,51.529 14.122,51.529 14.721,52.129 16.913,52.129 17.307,51.735 18.746,51.735 18.963,51.951 18.963,52.087 19.022,52.147 19.575,52.147 19.981,51.74 20.322,51.74 20.332,51.75 20.36,51.75 20.578,51.968 24.966,51.968 25.098,51.835 25.098,51.752 25.412,51.437 v1(25.412,51.413)
  Layer 4 w0.102: v1(25.412,51.413) 25.479,51.413 25.699,51.194 29.039,51.194 29.042,51.192 32.438,51.192 32.935,50.694 32.935,44.679 33.222,44.392 35.773,44.392 36.037,44.656 37.083,44.656 37.365,44.374 38.409,44.374 38.604,44.179 39.1,44.179 39.365,43.914 39.522,43.914 40.108,43.328 40.108,42.779 40.036,42.707 40.036,42.687 39.828,42.479 39.828,41.886 39.813,41.872 39.813,41.788 40.303,41.298 40.303,41.24 40.472,41.071 40.472,40.988 40.693,40.767 41.203,40.767 41.238,40.732 41.559,40.412 41.559,39.81 41.267,39.518 41.267,39.312 41.32,39.259 41.32,39.056 42.885,37.491 43.103,37.491 43.342,37.252 43.455,37.252 43.515,37.192 v1@43.515,36.564
  Bottom Layer w0.102: v1(-0.316,42.07) 0.083,41.672 5.001,41.672 5.11,41.781 6.88,41.781 7.114,41.547 7.114,41.37 7.246,41.238 7.872,41.238 7.924,41.29 8.094,41.29 8.146,41.238 8.772,41.238 9.118,41.583 9.118,42.894 R10.2@9.508,43.284
  Bottom Layer w0.305: v1(8.224,40.905) 8.227,40.907 8.938,40.907 9.508,41.477 R10.1@9.508,42.434 9.52,42.422 10.409,42.422 C55.1@10.422,42.409 ; R10.2@9.508,43.284 9.52,43.297 10.41,43.297 C55.2@10.422,43.309 10.422,44.268 10.6,44.446 v1(10.6,44.485)
  other v1: 8.224,38.839 7.704,38.855 8.238,39.372 6.187,40.345 5.661,40.37 8.161,40.37 7.374,40.395 1.889,40.607 0.51,40.628 6.18,40.903 7.36,40.897 5.661,40.954 0.502,41.288 1.846,41.306 26.215,49.769 25.544,49.82 25.089,50.082 25.91,50.3 25.442,50.513 25.031,50.836
VDDA_0V85_S0: C34.2 C218.2 C219.2 C226.2 C227.2 C277.2 C283.2 R67.2 U1.10 U8.AH13 U8.AH14 U8.AJ13 U8.AJ14 U8.L28 U8.M28 | length 122.2
  Top Layer w0.127: 5.873,58.791 7.044,58.791 R67.2@7.462,58.374
  Top Layer w0.142: v1(1.003,53.305) 0.981,53.327 0.981,54.021 1.058,54.098 1.058,56.72 1.796,57.458 4.14,57.458 5.466,58.784 5.872,58.784
  Top Layer w0.203: 6.993,48.969 7.093,48.969 7.217,49.093 7.241,49.093 7.286,49.139 U1.10@8.09,49.139
  Top Layer w0.254: U8.M28@39.832,26.472 U8.L28@40.292,26.012
  Top Layer w0.305: v1(4.78,48.373) 4.832,48.32 C34.2@4.928,48.32 ; C34.2@4.939,48.331 5.083,48.475 5.776,48.475 6.271,48.969 6.993,48.969 ; U8.AJ14@38.453,40.72 38.807,40.366 v1(38.913,40.26) U8.AH13@39.373,40.72 U8.AJ13@38.913,41.18 U8.AJ14@38.453,40.72
  Layer 3 w0.254: 37.097,22.61 39.174,22.61 40.703,24.139 40.703,25.88 40.672,25.911 40.564,25.911 40.398,26.077 v1(40.356,26.077)
  Layer 3 w0.305: 37.234,39.121 38.231,39.121 38.913,39.803 v1(38.913,40.26)
  Layer 3 w0.381: v1(20.83,46.561) 21.361,46.561 22.064,47.265 22.064,47.473 22.278,47.686
  Layer 3 w0.508: v1(4.78,48.373) 5.208,48.373 5.801,47.78 9.588,47.78 10.55,46.818 18.734,46.818 19.003,46.549 19.153,46.399 20.667,46.399 v1(20.83,46.561) ; v1(18.568,27.939) 19.067,27.44 19.067,25.903 19.583,25.388 22.745,25.388 22.946,25.588 26.316,25.588 26.593,25.311 29.41,25.311 32.435,22.286 35.642,22.286 35.967,22.61 37.097,22.61 ; 22.278,47.686 22.365,47.774 22.916,47.774 23.715,46.975 23.715,42.279 24.068,41.926 24.396,41.926 25.521,40.8 32.96,40.8 33.037,40.877 34.215,40.877 34.312,40.78 34.424,40.78 35.188,40.016 35.658,40.016 36.116,39.558 36.908,39.558 37.234,39.232 37.234,39.121
  Layer 4 w0.508: v1(18.568,27.939) 18.568,31.726 17.853,32.441 17.853,34.003 17.916,34.067 17.916,34.34 18.071,34.494 18.071,34.651 19.473,36.053 19.473,37.186 19.89,37.603 20.21,37.603 20.507,37.9 20.507,38.862 19.138,40.231 19.138,41.171 19.816,41.849 20.505,41.849 20.937,42.281 20.937,42.756 20.934,42.759 20.934,44.17 20.83,44.275 v1(20.83,46.561)
  Bottom Layer w0.142: v1(1.003,53.305) 1.035,53.273 1.035,52.886 1.107,52.815 1.107,49.908 2.317,48.698 4.228,48.698 4.302,48.624 4.338,48.624 4.436,48.526 4.554,48.526 4.707,48.373 v1(4.78,48.373)
  Bottom Layer w0.254: C277.2@39.817,26.439 39.817,26.389 39.84,26.366 40.025,26.366 40.314,26.077 v1(40.356,26.077)
  Bottom Layer w0.305: v1(38.913,40.26) 38.455,40.717 C218.2@38.452,40.717 38.934,41.199 38.938,41.199 C226.2@38.949,41.188 C227.2@39.397,40.74 ; v1(38.913,40.26) 39.393,40.74 C227.2@39.397,40.74 ; C227.2@39.406,40.73 C227.2@39.397,40.74
VDDA_1V2_S0: C15.2 C248.2 C249.2 U1.57 U8.AH20 | length 61.7
  Top Layer w0.203: U1.57@12.64,52.989 12.64,53.72 12.733,53.812 12.733,53.85 12.852,53.969 12.852,54.086
  Top Layer w0.254: v1(36.153,37.497) U8.AH20@36.153,37.5
  Top Layer w0.305: C15.2@11.743,56.448 12.124,56.067 12.158,56.067 12.327,55.899 12.556,55.899 12.852,55.603 12.852,54.086
  Layer 3 w0.305: v1(22.591,47.214) 22.591,47.19 22.868,46.913 22.868,46.336 22.545,46.013 22.545,45.435 22.821,45.16 v1(22.821,45.131)
  Layer 3 w0.508: v1(22.821,45.131) 22.821,44.006 v1(22.845,43.982) 22.845,41.528 23.66,40.713 24.417,40.713 24.555,40.575 25.168,39.962 32.976,39.962 33.177,40.163 34.165,40.163 35.355,38.972 35.823,38.972 36.375,38.42 36.375,37.718 v1(36.153,37.497)
  Layer 4 w0.305: v1(24.901,51.387) 24.881,51.407 24.881,52.045 24.88,52.047 24.88,52.318 25.112,52.55
  Layer 4 w0.508: v1(11.743,56.481) 12.346,57.085 12.425,57.085 12.527,57.187 12.845,57.187 13.377,57.719 13.377,60.373 13.675,60.671 23.464,60.671 25.516,58.619 25.516,52.848 25.218,52.55 25.112,52.55
  Bottom Layer w0.305: v1(22.591,47.214) 22.591,48.336 22.361,48.565 22.028,48.565 22.027,48.564 20.966,48.564 20.965,48.565 20.881,48.565 20.665,48.781 20.665,49.654 20.716,49.704 20.716,51.092 21.008,51.385 23.568,51.385 23.756,51.197 24.073,51.197 24.243,51.367 24.881,51.367 v1(24.901,51.387)
  other v1: 22.858,44.55
VDDA_DDR_PLL_S0: C32.2 C205.2 C212.2 U1.12 U8.L15 U8.N12 | length 168.7
  Top Layer w0.142: 46.414,32.576 46.582,32.744 46.582,33.037 46.53,33.089 46.327,33.291 46.327,33.409 46.61,33.692 46.635,33.692
  Top Layer w0.164: v1(46.268,31.984) 46.268,32.43 46.414,32.576
  Top Layer w0.185: 46.635,33.692 46.723,33.779 v1(46.723,34.276)
  Top Layer w0.203: 6.993,48.157 7.089,48.157 7.191,48.258 7.243,48.258 7.377,48.392 8.043,48.392 U1.12@8.09,48.439
  Top Layer w0.305: v1(4.736,46.94) 4.757,46.919 4.907,46.919 C32.2@4.928,46.898 5.026,46.995 5.407,46.995 6.103,47.692 6.143,47.692 6.607,48.157 6.993,48.157
  Layer 3 w0.254: v1(46.723,34.276) 46.765,34.276 47.097,34.608 47.764,34.608 47.927,34.445 48.137,34.445 48.256,34.564 48.268,34.564 48.361,34.656 49.707,34.656 51.447,36.396 51.447,36.556 52.011,37.12 52.011,37.884 52.372,38.245 53.288,38.245
  Layer 3 w0.305: 52.631,8.271 52.631,12.624 52.544,12.711 52.544,19.035 53.802,20.292 53.802,20.833 54.223,21.255 54.906,21.255 55.516,21.865 56.151,21.865 56.63,22.344 56.63,23.196 56.639,23.205 56.639,23.887 56.971,24.219 58.165,24.219 58.45,24.504 58.45,28.283 58.935,28.768 58.935,29.75 59.1,29.915 59.1,30.287 58.335,31.052 58.335,34.224 55.922,36.637 55.922,36.838 54.172,38.588 53.631,38.588 53.288,38.245
  Layer 3 w0.508: v1(-0.435,47.46) -0.877,47.018 -0.877,38.095 -1.603,37.369 -1.603,3.739 0.073,2.063 1.785,2.063 3.339,0.508 10.967,0.508 12.849,-1.374 51.361,-1.374 51.719,-1.016 51.719,0.036 52.399,0.716 52.399,2.614 52.374,2.639 52.374,3.457 52.902,3.986 52.902,7.156 52.631,7.427 52.631,8.271
  Bottom Layer w0.305: v1(-0.435,47.46) 1.036,47.46 1.292,47.204 3.032,47.204 3.125,47.296 3.281,47.296 3.547,47.562 4.207,47.562 4.385,47.383 4.385,47.319 4.736,46.968 v1(4.736,46.94)
VDDQ_DDR: C39.2 C40.2 C41.2 C42.2 C185.2 C186.2 C187.2 C188.2 C189.2 C190.2 C191.2 C193.2 C194.2 C195.2 C196.2 C197.2 C198.2 C199.2 C322.2 C323.2 C324.2 C325.2 C326.2 C327.2 C328.2 C329.2 C330.2 C331.2 C332.2 C333.2 C334.2 C335.2 C336.2 C337.2 C338.2 C339.2 C340.2 C366.2 C367.2 C368.2 C369.2 C370.2 C371.2 C372.2 C373.2 C374.2 C375.2 C376.2 C377.2 C378.2 C379.2 C380.2 C381.2 C382.2 C383.2 C384.2 L5.2 R7.2 R45.1 R46.1 R47.1 R48.1 R85.1 R86.1 R95.1 R96.1 U1.67 U8.K11 U8.K12 U8.K13 U8.K14 U8.K15 U8.L10 U8.M10 U8.M13 U8.N10 U8.P10 U8.R10 U8.T10 U9.AA3 U9.AA5 U9.AA8 U9.AA10 U9.B3 U9.B5 U9.B8 U9.B10 U9.D1 U9.D5 U9.D8 U9.D12 U9.F3 U9.F10 U9.U3 U9.U10 U9.W1 U9.W5 U9.W8 U9.W12 U10.AA3 U10.AA5 U10.AA8 U10.AA10 U10.B3 U10.B5 U10.B8 U10.B10 U10.D1 U10.D5 U10.D8 U10.D12 U10.F3 U10.F10 U10.U3 U10.U10 U10.W1 U10.W5 U10.W8 U10.W12 | length 185.3
  Top Layer w0.203: 6.993,53.785 7.6,53.785 7.656,53.728 8.838,53.728 9.14,53.426 U1.67@9.14,52.989
  Top Layer w0.254: v1(53.36,48.385) 53.413,48.385 53.804,48.776 54.075,48.776 U9.D1@54.08,48.781 ; v1(54.249,50.925) 54.249,50.875 U9.B3@54.292,50.832 ; v1(55.061,20.292) 55.092,20.262 U10.W1@55.478,20.262 ; U9.B5@55.423,51.963 55.428,51.968 55.876,51.968 v1(55.9,51.992) ; U10.AA3@55.69,18.211 55.697,18.211 55.724,18.184 v1(56.23,18.184) ; v1(56.016,48.773) 56.046,48.803 56.046,48.902 56.13,48.986 U9.F3@56.13,48.993 ; U9.D5@56.343,51.044 56.348,51.049 56.732,51.049 v1(56.749,51.066) ; U10.AA5@56.821,17.08 56.826,17.075 57.328,17.075 v1(57.339,17.065) ; v1@56.956,53.655 57.115,53.655 U9.B8@57.12,53.66 ; v1(57.06,20.126) 57.137,20.05 U10.U3@57.528,20.05 ; v1(57.16,18.004) 57.162,18.002 57.738,18.002 U10.W5@57.74,17.999 ; v1(57.547,52.75) 57.551,52.746 58.035,52.746 U9.D8@58.04,52.741 ; v1(57.779,54.786) 57.785,54.792 U9.B10@58.252,54.792 ; v1(58.495,15.817) 58.513,15.799 58.513,15.388 U10.AA8@58.518,15.383 ; U10.W8@59.437,16.302 59.437,15.993 v1(59.481,15.949) ; U10.AA10@59.649,14.252 59.649,13.756 v1(59.715,13.69) ; v1(59.996,53.175) 60.026,53.145 60.026,53.024 60.09,52.96 U9.F10@60.09,52.953 ; U9.D12@60.302,55.004 60.313,55.014 v1(60.827,55.014) ; U9.W1@60.974,41.887 61.055,41.806 61.055,41.804 v1(61.04,41.789) ; v1(61.135,43.393) 61.132,43.396 61.186,43.45 U9.U3@61.186,43.938 ; U10.U10@61.488,16.09 61.488,15.644 v1(61.538,15.593) ; U10.W12@61.7,14.04 61.705,14.035 61.705,13.591 v1(61.712,13.584) ; v1(62.173,27.684) 62.372,27.485 U10.D1@62.372,27.156 ; U10.F3@62.584,25.106 63.107,25.106 63.16,25.159 v1(63.202,25.159) ; v1(62.994,41.516) 63.02,41.542 63.02,42.094 U9.AA3@63.025,42.099 ; U9.W5@63.237,44.15 63.242,44.155 63.242,44.446 63.4,44.604 v1(63.4,44.646) ; U9.AA5@64.156,43.231 64.161,43.236 64.644,43.236 v1(64.67,43.261) ; v1(64.383,27.277) 64.417,27.243 64.417,26.949 U10.B3@64.422,26.944 ; v1(64.898,45.236) 64.898,45.278 64.934,45.314 U9.W8@64.934,45.847 ; U9.U10@65.146,47.897 65.151,47.902 65.509,47.902 65.635,48.028 v1(65.677,48.028) ; v1(65.806,44.448) 65.806,44.88 U9.AA8@65.853,44.928 ; v1(66.323,23.671) 66.327,23.667 66.327,23.201 U10.D8@66.332,23.197 ; U10.F10@66.544,21.146 66.549,21.141 66.549,20.885 66.619,20.815 v1(66.619,20.773) ; U9.AA10@66.985,46.059 66.99,46.064 66.99,46.476 67.111,46.598 v1(67.111,46.64) ; U9.W12@67.197,48.11 67.202,48.115 67.489,48.115 67.531,48.156 v1(67.584,48.156) ; U10.B8@67.251,24.116 67.255,24.111 67.686,24.111 v1(67.69,24.107) ; U10.B10@68.382,22.984 68.854,22.984 v1(68.879,22.959) ; U10.D12@68.594,20.934 68.597,20.936 69.081,20.936 69.083,20.934 v1(69.083,20.925)
  Top Layer w0.305: C41.2@2.091,55.646 2.098,55.654 3,55.654 C39.2@3.006,55.66 ; C41.2@2.097,55.654 v1(2.097,55.673) ; v1(3.005,55.661) C39.2@3.234,55.434 4.206,55.434 4.431,55.659 v1(4.46,55.659) 4.46,55.704 4.807,56.052 4.978,56.052 5.326,55.704 v1(5.326,55.637) ; L5.2@5.149,55.813 v1(5.326,55.637) ; R7.2@6.409,55.31 5.875,55.31 ; 6.993,53.785 6.842,53.785 6.812,53.755 6.054,53.755 5.875,53.933 5.875,55.31 ; v1(5.326,55.637) 5.354,55.637 5.68,55.31 5.875,55.31
  Top Layer w0.381: v1(46.268,36.574) v1(46.727,36.115) 47.25,35.592 47.25,35.47 v1(47.474,35.246) ; U8.K15@46.727,31.527 U8.K13@47.646,32.446 U8.K11@48.565,33.366 48.565,34.228 v1(48.57,34.233) 48.57,34.281 U8.L10@48.565,34.285 U8.M10@48.105,34.745 48.097,34.745 47.969,34.872 U8.N10@47.646,35.196
  Layer 3 w0.254: v1(53.36,48.385) 53.36,49.2 54.122,49.962 54.122,50.248 ; v1@55.044,20.292 55.044,20.232 54.82,20.009 54.82,19.472 55.138,19.154 ; v1(55.061,20.292) 56.309,20.292 56.474,20.127 57.031,20.127 v1@57.043,20.115 ; 55.455,51.639 55.455,51.213 56.172,50.496 ; v1(55.9,51.992) 55.857,51.992 55.517,51.651 54.647,51.651 54.278,51.282 54.278,50.955 v1(54.249,50.925) 54.219,50.895 54.219,50.345 54.122,50.248 ; v1(56.016,48.773) 55.992,48.796 55.992,49.204 55.866,49.331 55.866,49.682 56.172,49.988 56.172,50.496 ; v1(56.23,18.184) 55.26,19.154 55.138,19.154 ; v1@56.263,18.193 56.452,18.004 v1(57.16,18.004) ; v1(56.749,51.066) 56.743,51.066 56.172,50.496 ; v1(56.844,53.485) v1@57.495,52.834 ; v1@57.19,17.993 57.19,17.932 57.339,17.783 v1(57.339,17.065) ; v1(57.547,52.75) 57.525,52.772 57.525,53.569 57.779,53.823 v1(57.779,54.786) 58.537,54.786 ; v1@58.53,15.783 58.504,15.756 58.504,14.902 v1(59.715,13.69) 61.511,13.69 ; 58.622,14.999 60.164,14.999 60.759,15.593 v1(61.538,15.593) ; 58.622,15.09 v1(59.481,15.949) ; v1@59.768,13.625 59.768,13.069 59.341,12.642 56.847,12.642 53.527,15.962 53.527,18.07 54.612,19.154 55.138,19.154 ; v1(59.996,53.175) 59.996,53.217 59.705,53.509 59.705,54.376 ; v1(61.135,43.393) 61.135,41.926 61.04,41.831 v1(61.04,41.789) 61.04,41.774 61.098,41.774 61.324,41.547 62.181,41.547 ; v1(61.712,13.584) 62.575,12.721 64.49,12.721 69.478,17.709 69.478,20.529 v1(69.083,20.925) ; v1(62.173,27.684) 63.263,27.684 63.997,26.95 ; v1(62.994,41.516) 62.964,41.546 62.663,41.546 62.662,41.547 62.181,41.547 ; v1(63.202,25.159) 63.236,25.159 63.546,25.469 63.987,25.469 ; v1(63.4,44.646) 63.4,44.688 63.666,44.954 63.666,45 63.979,45.314 64.387,45.314 64.435,45.266 64.868,45.266 v1(64.898,45.236) ; 64.028,45.314 64.028,45.065 65.238,43.854 ; v1(64.383,27.277) 64.383,27.235 64.007,26.859 64.007,25.489 63.987,25.469 ; v1(64.67,43.261) 64.67,40.996 64.259,40.584 62.928,40.584 62.181,41.331 62.181,41.547 ; v1(64.67,43.261) 64.67,43.287 65.238,43.854 ; v1(65.45,26.084) 65.45,24.763 65.341,24.653 ; v1(65.677,48.028) 65.707,48.058 66.128,48.058 66.482,48.413 66.857,48.413 67.083,48.186 67.554,48.186 v1(67.584,48.156) ; v1(66.619,20.773) 66.661,20.773 66.95,21.062 68.864,21.062 v1@68.993,20.932 ; v1@67.232,46.746 67.683,46.746 68.475,45.954 68.475,44.918 68.005,44.448 v1(65.806,44.448) 65.806,44.422 65.238,43.854 ; 67.634,46.764 67.584,46.815 v1(67.584,48.156) ; v1@67.678,24.095 67.254,23.671 v1(66.323,23.671) 65.341,24.653 ; v1@67.695,24.077 67.762,24.077 v1(68.879,22.959) 68.879,21.047 ; 54.122,50.248 53.503,50.248 52.354,51.397 52.354,54.565 54.886,57.097 57.37,57.097 58.537,55.93 58.537,54.786 ; 58.537,54.786 59.296,54.786 59.705,54.376 ; 59.705,54.376 60.189,54.376 v1(60.827,55.014) 60.839,55.002 61.413,55.002 61.503,54.913 62.265,54.913 62.328,54.976 63.878,54.976 68.084,50.77 68.084,48.657 v1(67.584,48.156) ; 63.987,25.469 64.348,25.469 64.557,25.26 64.557,25.045 64.615,24.987 65.007,24.987 65.341,24.653
  Bottom Layer w0.102: 45.889,29.951 46.161,29.68 46.161,29.572 ; 46.056,30.296 46.132,30.373 46.132,30.392 46.286,30.546 46.286,30.669
  Bottom Layer w0.117: 46.286,30.669 46.728,31.11 C188.2@46.728,31.525
  Bottom Layer w0.129: 45.889,29.951 45.889,30.13 46.056,30.296
  Bottom Layer w0.254: 46.161,29.572 46.161,29.01 46.49,28.681 46.729,28.681 R48.1@46.764,28.717 ; C379.2@57.093,16.787 57.339,17.032 v1(57.339,17.065) ; C375.2@59.532,14.171 59.601,14.101 v1@59.601,13.857 ; v1(61.712,13.584) 61.709,13.581 61.709,13.497 62.041,13.165 62.041,12.946 C366.2@61.97,12.876 ; C330.2@67.609,48.258 67.705,48.354 68.509,48.354 C322.2@68.544,48.389 ; v1@67.727,24.198 67.727,24.475 R96.1@68.346,25.093 ; v1(69.083,20.925) 69.083,20.774 C384.2@69.387,20.47
  Bottom Layer w0.305: v1(5.326,55.637) 5.354,55.637 5.68,55.31 C42.2@6.409,55.31 ; R45.1@46.421,38.86 46.419,38.857 46.419,38.51 45.856,37.948 45.856,37.303 45.892,37.268 C193.2@45.892,37.006 45.892,36.95 v1(46.268,36.574) v1(46.727,36.115) v1(47.187,35.655) 47.187,35.562 47.454,35.294 v1@47.454,35.269 ; C188.2@46.728,31.525 C189.2@48.559,33.356 C190.2@48.96,33.757 ; v1(46.799,33.339) 47.669,32.47 47.669,32.466 C186.2@47.644,32.442 ; v1(47.474,35.246) 47.479,35.251 47.655,35.251 C196.2@47.687,35.219 47.687,35.215 47.969,34.932 47.969,34.872 C199.2@48.565,34.276 48.57,34.272 v1(48.57,34.233) 48.96,33.843 C190.2@48.96,33.757 ; R47.1@50.799,33.373 50.799,33.419 50.951,33.571 50.951,33.917 50.827,33.917 50.494,33.584 50.154,33.584 49.883,33.856 49.313,33.856 49.214,33.757 C190.2@48.96,33.757 ; C327.2@65.196,48.263 65.241,48.263 65.457,48.047 v1@65.587,48.047
  other v1: 64.586,25.017 74.002,30.81 48.058,34.961 3.02,55.006 3.52,55.024 3.539,55.669 4.453,56.204 5.33,56.204
pads on no net: BTB_1.21 BTB_1.22 BTB_1.24 BTB_1.25 BTB_1.26 BTB_1.27 BTB_1.29 BTB_1.30 BTB_1.32 BTB_1.33 BTB_1.34 BTB_1.35 BTB_1.67 BTB_1.68 BTB_1.69 BTB_1.70 BTB_1.72 BTB_1.73 BTB_1.75 BTB_1.76 BTB_1.77 BTB_1.78 BTB_1.80 BTB_1.81 BTB_2.33 BTB_2.34 BTB_2.35 BTB_2.36 BTB_2.38 BTB_2.39 BTB_2.41 BTB_2.42 BTB_2.43 BTB_2.44 BTB_2.52 BTB_2.53 BTB_2.54 BTB_2.55 BTB_2.56 BTB_2.57 BTB_2.58 BTB_2.59 BTB_2.60 BTB_2.61 BTB_2.62 BTB_2.63 BTB_2.64 BTB_2.67 BTB_2.69 BTB_2.70 BTB_2.76 BTB_2.78 BTB_2.80 BTB_2.82 BTB_2.83 BTB_2.85 BTB_2.86 BTB_2.87 BTB_2.90 BTB_2.91 BTB_3.6 BTB_3.14 BTB_3.57 BTB_4.52 BTB_4.53 BTB_4.54 BTB_4.55 BTB_4.56 BTB_4.57 BTB_4.58 BTB_4.59 JP1.0 U1.2 U1.3 U1.38 U1.47 U1.48 U8.A27 U8.AA27 U8.AA28 U8.AA29 U8.AA30 U8.AC28 U8.AC29 U8.AD4 U8.AD27 U8.AD28 U8.AD29 U8.AD30 U8.AE27 U8.AE29 U8.AF3 U8.AF5 U8.AF6 U8.AF18 U8.AF19 U8.AG4 U8.AG5 U8.AG19 U8.AG23 U8.AG24 U8.AG25 U8.AG26 U8.AG28 U8.AG29 U8.AG31 U8.AG32 U8.AG33 U8.AG34 U8.AH5 U8.AH6 U8.AH19 U8.AH24 U8.AH25 U8.AH26 U8.AH29 U8.AH30 U8.AH31 U8.AH32 U8.AH33 U8.AH34 U8.AJ4 U8.AJ5 U8.AJ19 U8.AJ24 U8.AJ31 U8.AJ32 U8.AJ33 U8.AJ34 U8.AK15 U8.AK17 U8.AK18 U8.AK19 U8.AK20 U8.AK21 U8.AK22 U8.AK25 U8.AK27 U8.AK30 U8.AK31 U8.AK32 U8.AK33 U8.AK34 U8.AL17 U8.AL18 U8.AL19 U8.AL20 U8.AL21 U8.AL22 U8.AL28 U8.AL30 U8.AL31 U8.AL32 U8.AL33 U8.AL34 U8.AM25 U8.AM29 U8.AM31 U8.AM32 U8.AM33 U8.AM34 U8.AN18 U8.AN19 U8.AN20 U8.AN21 U8.AN22 U8.AP18 U8.AP19 U8.AP20 U8.AP21 U8.AP22 U8.C19 U8.D7 U8.D10 U8.D14 U8.D17 U8.E7 U8.E10 U8.E17 U8.F28 U8.G9 U8.G18 U8.G30 U8.G31 U8.H4 U8.H5 U8.H9 U8.H18 U8.H29 U8.H30 U8.J30 U8.J31 U8.K4 U8.K5 U8.K7 U8.M7 U8.T5 U8.V6 U8.V7 U8.W4 U8.W5 U8.W31 U8.Y27 U8.Y30 U8.Y31 U9.A1 U9.A2 U9.A11 U9.A12 U9.AA1 U9.AA12 U9.AB1 U9.AB2 U9.AB11 U9.AB12 U9.B1 U9.B12 U9.G11 U9.K5 U9.K8 U9.N5 U9.N8 U10.A1 U10.A2 U10.A11 U10.A12 U10.AA1 U10.AA12 U10.AB1 U10.AB2 U10.AB11 U10.AB12 U10.B1 U10.B12 U10.G11 U10.K5 U10.K8 U10.N5 U10.N8 U11.A1 U11.A2 U11.A7 U11.A8 U11.A9 U11.A10 U11.A11 U11.A12 U11.A13 U11.A14 U11.B1 U11.B7 U11.B8 U11.B9 U11.B10 U11.B11 U11.B12 U11.B13 U11.B14 U11.C1 U11.C3 U11.C5 U11.C7 U11.C8 U11.C9 U11.C10 U11.C11 U11.C12 U11.C13 U11.C14 U11.D1 U11.D2 U11.D3 U11.D4 U11.D12 U11.D13 U11.D14 U11.E1 U11.E2 U11.E3 U11.E5 U11.E8 U11.E9 U11.E10 U11.E12 U11.E13 U11.E14 U11.F1 U11.F2 U11.F3 U11.F10 U11.F12 U11.F13 U11.F14 U11.G1 U11.G2 U11.G3 U11.G10 U11.G12 U11.G13 U11.G14 U11.H1 U11.H2 U11.H3 U11.H12 U11.H13 U11.H14 U11.J1 U11.J2 U11.J3 U11.J12 U11.J13 U11.J14 U11.K1 U11.K2 U11.K3 U11.K6 U11.K7 U11.K10 U11.K12 U11.K13 U11.K14 U11.L1 U11.L2 U11.L3 U11.L12 U11.L13 U11.L14 U11.M1 U11.M2 U11.M3 U11.M7 U11.M8 U11.M9 U11.M10 U11.M11 U11.M12 U11.M13 U11.M14 U11.N1 U11.N3 U11.N6 U11.N7 U11.N8 U11.N9 U11.N10 U11.N11 U11.N12 U11.N13 U11.N14 U11.P1 U11.P2 U11.P7 U11.P8 U11.P9 U11.P10 U11.P11 U11.P12 U11.P13 U11.P14 USBC1. USBC1.A4B9 USBC1.A5 USBC1.A8 USBC1.B4A9 USBC1.B5 USBC1.B8
copper on no net:
  other v1: 4.072,43.606
  other v2: 31.981,4.093 58.381,4.093 3.101,4.22 29.501,4.22 31.981,66.043 58.381,66.043 3.101,66.17 29.501,66.17

## Polygon pours and split planes (outlines as drawn)
GND on Layer 4 "GND_L04_P193" (solid, remove dead copper, pour order 193): -2,69.995 -1.995,70 75,70 75,-2.001 -2,-2.001
VDD_DDR_S0 on Layer 4 "VDD_DDR_S0_L04_P071" (solid, remove dead copper, pour order 71): 19 vertices, not listed, extent -1.276,6.157 20.68,54.953
VDD_CPU_LIT_S0 on Layer 4 "VDD_CPU_LIT_S0_L04_P180" (solid, remove dead copper, pour order 180): 23.682,30.783 26.189,28.276 30.672,28.276 30.672,31.771 30.971,32.07 39.182,32.07 40.103,31.148 40.835,31.148 41.401,31.715 38.549,34.567 35.26,34.567 34.622,35.205 24.157,35.205 23.662,34.709
VDD_LOGIC_S0 on Layer 4 "VDD_LOGIC_S0_L04_P045" (solid, remove dead copper, pour order 45): 22.367,56.863 25.252,56.863 25.252,49.398 26.771,47.879 26.771,37.402 24.294,37.402 24.294,47.506 22.59,49.21 22.367,49.21
VDD_LOGIC_S0 on Layer 4 "VDD_LOGIC_S0_L04_P028" (solid, remove dead copper, pour order 28): 39.102,39.657 34.381,39.657 24.876,39.657 24.876,34.859 41.52,34.859
VDD_VDENC_S0 on Layer 4 "VDD_VDENC_S0_L04_P185" (solid, remove dead copper, pour order 185): 43.334,37.112 43.344,37.102 43.636,37.102 43.636,37.097 43.715,37.018 43.705,37.008 43.705,36.587 43.606,36.487 43.311,36.487